# Altium PCB Driver_S_Comm.PcbDoc (part 4 of 5)
Units mm, origin at the board's own origin, x right, y up, seen from the top; angles counter-clockwise.
Board outline 200.2 x 290.2 mm, 2 copper layers (Top Layer, Bottom Layer), stack 1.371 mm thick; 518 components, 197 nets, 1403 pads, 323 vias.
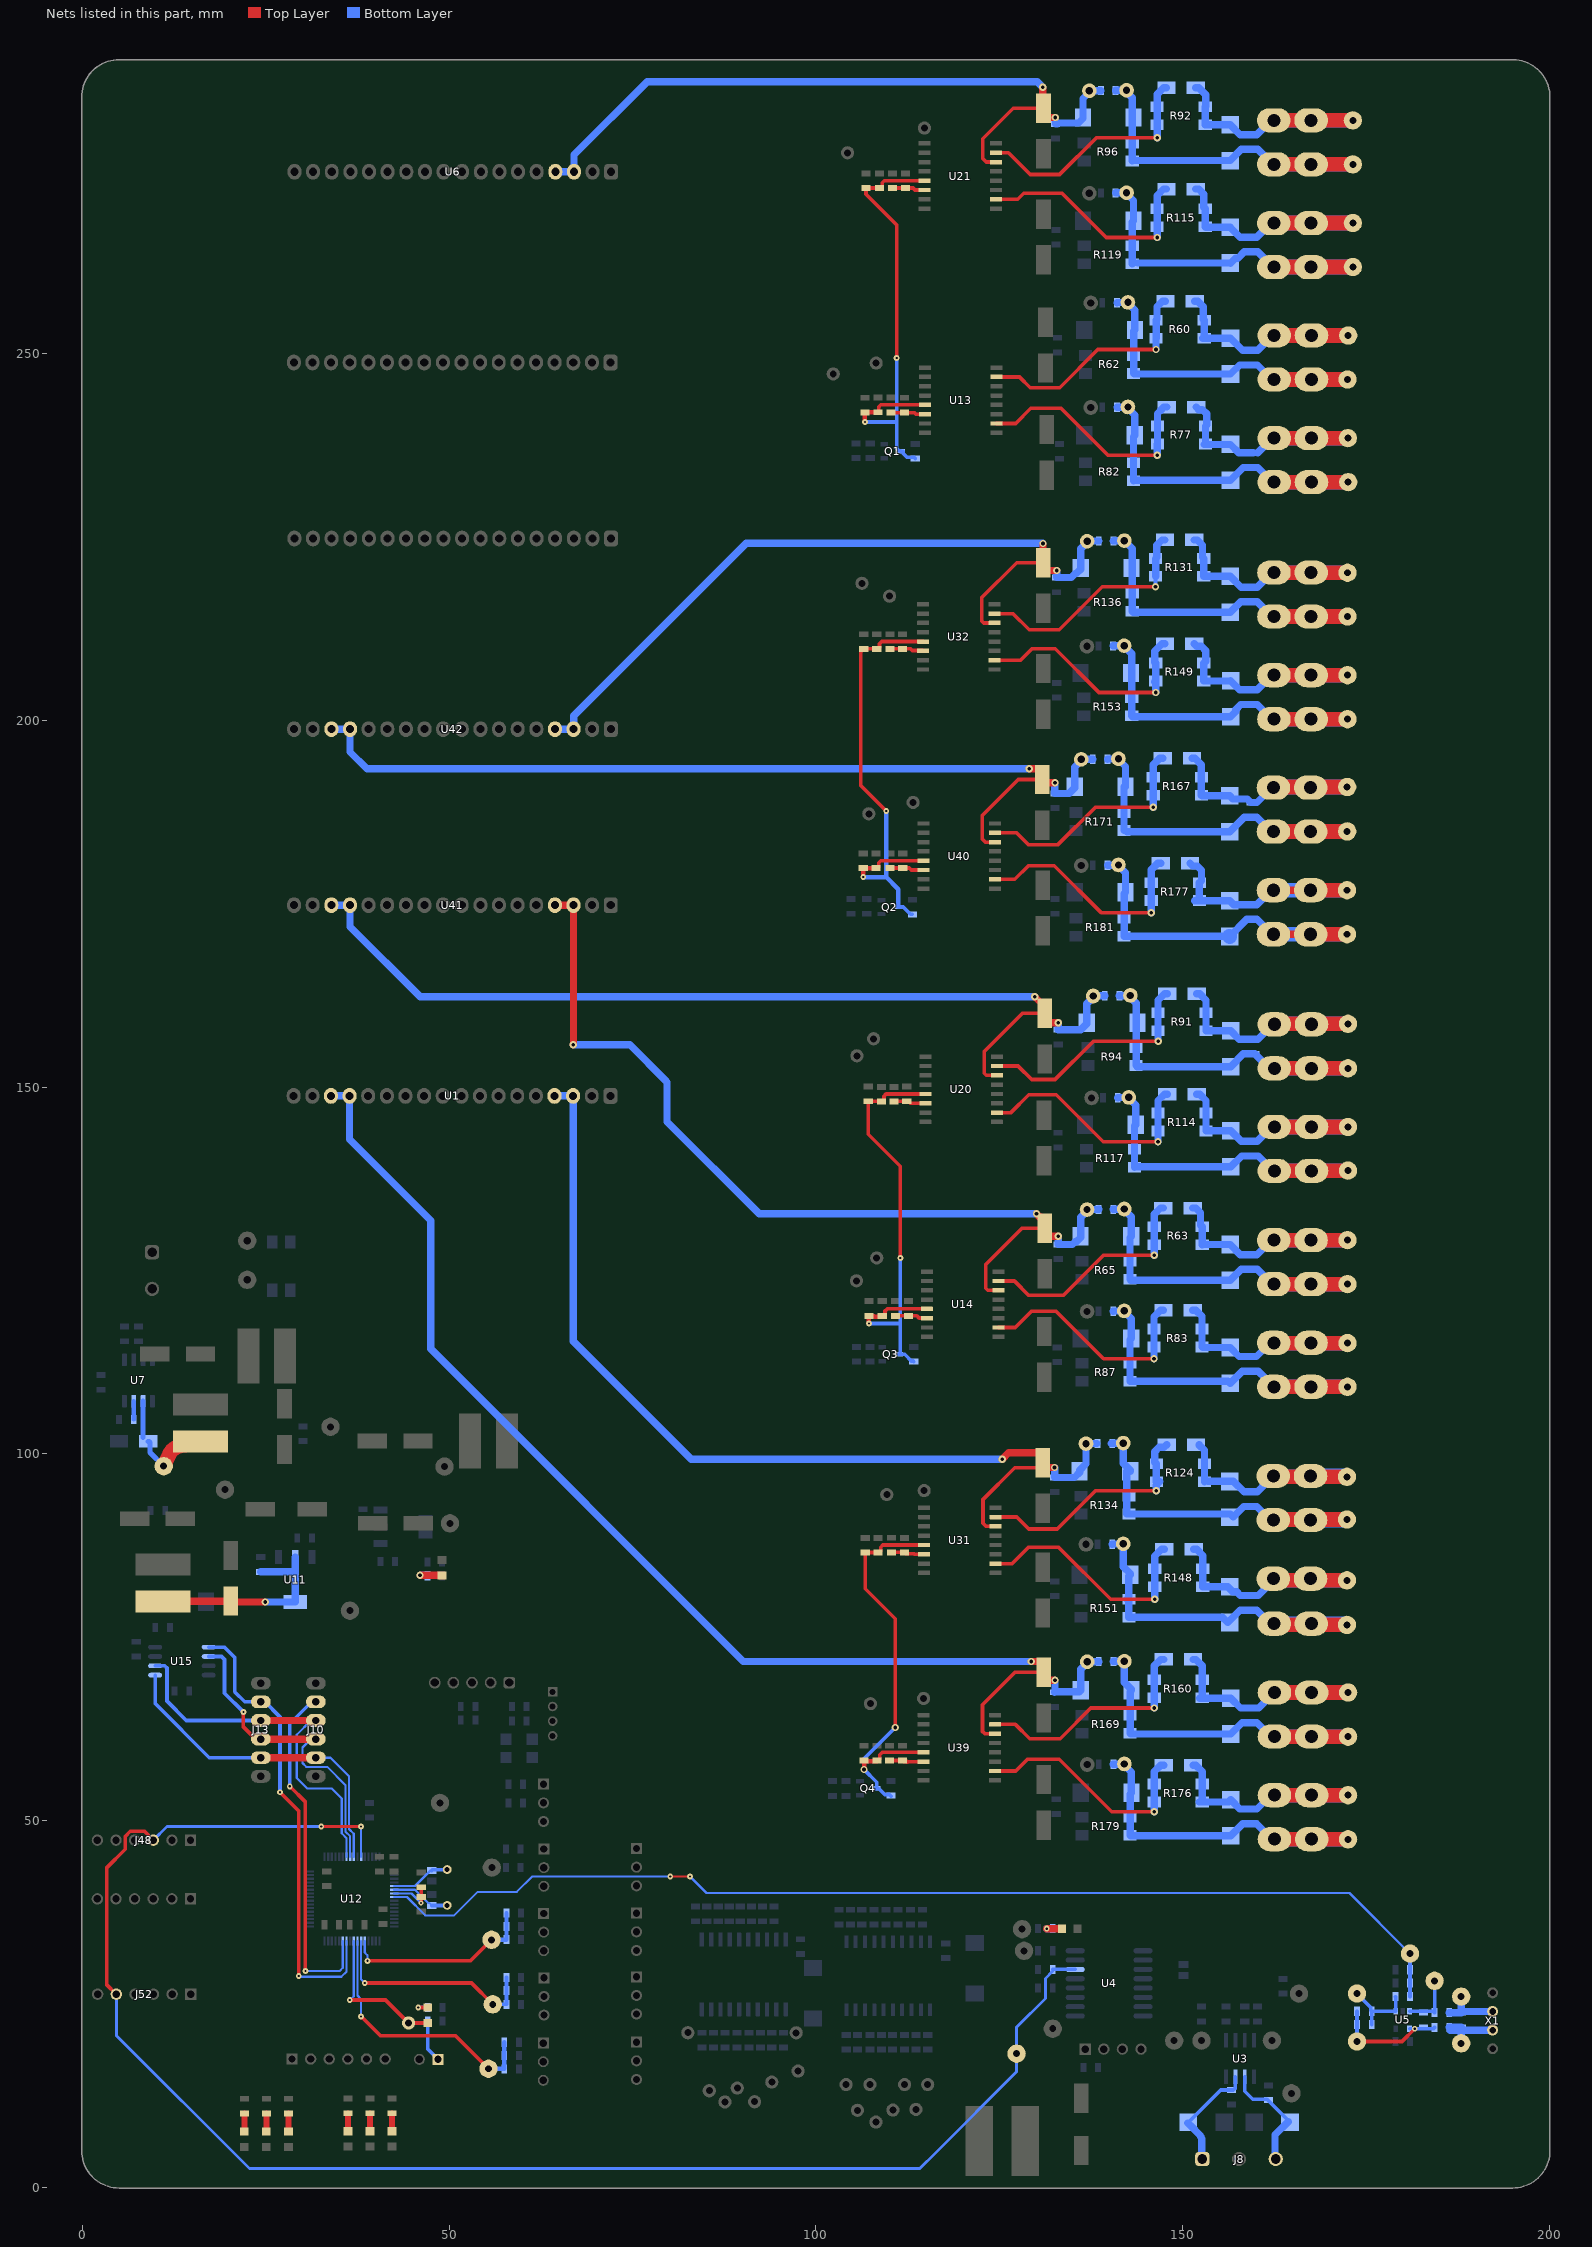
[diagram p3: the nets of this part, all layers, seen from the top]

## Via types
v1: diameter 1, hole 0.5, Top Layer to Bottom Layer, tented both sides, 118 vias
v2: diameter 0.8, hole 0.3, Top Layer to Bottom Layer, 112 vias
v3: diameter 0.8, hole 0.3, Top Layer to Bottom Layer, tented both sides, 64 vias
v4: diameter 2, hole 1, Top Layer to Bottom Layer, tented both sides, 11 vias
v5: diameter 1, hole 0.5, Top Layer to Bottom Layer, 9 vias
v6: diameter 0.8, hole 0.4, Top Layer to Bottom Layer, 5 vias
v7: diameter 0.8, hole 0.4, Top Layer to Bottom Layer, tented both sides, 2 vias
v8: diameter 0.7, hole 0.3, Top Layer to Bottom Layer, tented both sides, 1 vias
v9: diameter 1.5, hole 1, Top Layer to Bottom Layer, tented both sides, 1 vias

## Nets (pads, with @x,y where several pads share a name; then routed paths per layer and width w, separated by ;. In a path a pad name is that pad's centre, name@x,y a point inside that pad or via, vN(x,y) a via of type N, cw(c..) or ccw(c..) an arc to the next point about the centre after c; other vN are vias at no path point) (continued)
GND_-24V_3: C86.1 C88.2 C92.2 C94.1 U6.3 U6.4 U21.14 VD13.2 | length 103.7
  Top Layer w0.5: U21.14@124.565,276.138 123.237,276.138 122.755,276.62 122.755,279.312 126.925,283.483 130.55,283.483 C88.2@131.05,283.483 131.05,282.973 C88.2@131.8,282.223
  Top Layer w1: v1(130.95,286.325) 130.95,283.583 C88.2@131.05,283.483 ; C88.2@131.8,282.223 v1(132.66,282.223)
  Bottom Layer w0.5: v1(132.66,282.223) v1@132.67,282.213 ; C86.1@132.67,281.352 C86.1@132.68,281.343
  Bottom Layer w1: U6.4@64.48,274.815 U6.3@67.02,274.815 67.02,277.12 77,287.1 130.175,287.1 v1(130.95,286.325) ; v1@132.67,282.213 132.67,281.352 C86.1@132.68,281.343 ; C86.1@132.9,281.343 133.03,281.473 135.82,281.473 136.42,282.073 136.42,284.81 137.295,285.685 VD13.2@137.295,285.858 137.307,285.87 138.858,285.87 C94.1@138.87,285.882
GND_-24V_4: C115.1 C117.2 C122.2 C123.1 U32.14 U42.3 U42.4 VD23.2 | length 109.3
  Top Layer w0.5: U32.14@124.375,213.299 122.898,213.299 122.605,213.591 122.605,216.718 127.398,221.512 130.5,221.512 C117.2@131,221.512
  Top Layer w1: v1(130.975,224.125) 130.975,221.537 C117.2@131,221.512 131,220.944 131.5,220.444 v1(132.85,220.444)
  Bottom Layer w1: U42.4@64.43,198.815 U42.3@66.97,198.815 66.99,198.835 66.99,200.644 90.496,224.15 130.95,224.15 v1(130.975,224.125) ; v1(132.85,220.444) 132.85,219.524 C115.1@132.81,219.484 134.82,219.484 135.37,220.034 135.52,220.034 136.116,220.629 C122.2@136.116,220.779 ; C122.2@136.12,220.784 136.12,223.401 136.995,224.276 VD23.2@136.995,224.449 137.007,224.461 138.558,224.461 C123.1@138.57,224.473
GND_-24V_5: C149.1 C150.2 C153.2 C154.1 U40.14 U42.15 U42.16 VD31.2 | length 129.6
  Top Layer w0.5: U40.14@124.428,183.419 123.108,183.419 122.693,183.834 122.693,187.034 127.601,191.942 C150.2@130.873,191.942 ; C150.2@130.19,193.604 130.873,192.921 C150.2@130.873,191.942 ; C150.2@131.311,191.504 C150.2@130.873,191.942
  Top Layer w1: v1(129.1,193.4) C150.2@129.987,193.4 ; C150.2@131.311,191.504 v1(132.603,191.504)
  Bottom Layer w1: U42.16@33.95,198.815 U42.15@36.49,198.815 36.49,195.71 38.8,193.4 v1(129.1,193.4) ; v1(132.603,191.504) 132.593,191.494 C149.1@132.593,190.054 134.543,190.054 134.703,190.214 134.713,190.214 135.313,190.814 135.313,193.651 136.188,194.526 VD31.2@136.188,194.699 136.2,194.711 137.75,194.711 C154.1@137.763,194.724
GND_-24V_6: C59.1 C60.2 C63.2 C66.1 U14.14 U41.3 U41.4 VD5.2 | length 128.2
  Top Layer w0.5: U14.14@124.891,122.309 123.449,122.309 123.156,122.602 123.156,125.819 128.104,130.767 C60.2@131.236,130.767 131.236,131.614 C60.2@130.747,132.103
  Top Layer w1: U41.4@64.42,174.815 U41.3@66.96,174.815 66.96,155.81 v1(66.925,155.775) ; v1(130.093,132.724) 130.55,132.267 130.736,132.267 130.747,132.256 C60.2@130.747,132.103 ; C60.2@131.236,130.767 131.236,130.159 131.736,129.659 v1(133.046,129.659)
  Bottom Layer w1: v1(66.925,155.775) 74.675,155.775 79.55,150.9 79.55,150.844 79.705,150.689 79.705,145.295 92.276,132.724 v1(130.093,132.724) ; v1(133.046,129.659) 133.046,128.569 C59.1@133.056,128.559 135.006,128.559 135.356,128.909 135.506,128.909 136.106,129.509 C63.2@136.106,129.659 136.106,132.266 136.981,133.141 VD5.2@136.981,133.314 136.993,133.326 138.543,133.326 C66.1@138.556,133.339
GND_-24V_7: C85.1 C87.2 C90.2 C93.1 U20.14 U41.15 U41.16 VD12.2 | length 134.5
  Top Layer w0.5: U20.14@124.689,151.614 123.267,151.614 122.974,151.907 122.974,154.869 128.172,160.067 C87.2@131.194,160.067 ; C87.2@130.358,161.817 130.444,161.817 131.194,161.067 C87.2@131.194,160.067 ; C87.2@131.944,158.799 131.194,159.549 C87.2@131.194,160.067
  Top Layer w1: v1(129.85,162.325) C87.2@130.358,161.817 ; C87.2@131.944,158.799 v1(133.074,158.799)
  Bottom Layer w0.5: C85.1@133.064,157.839 C85.1@133.069,157.844 ; v1@133.069,158.794 v1(133.074,158.799)
  Bottom Layer w1: U41.16@33.94,174.815 U41.15@36.48,174.815 36.48,171.895 46.05,162.325 v1(129.85,162.325) ; C85.1@133.064,157.839 136.134,157.839 136.944,158.649 136.944,161.386 137.819,162.261 VD12.2@137.819,162.434 137.831,162.446 139.381,162.446 C93.1@139.394,162.459 ; C85.1@133.069,157.844 v1@133.069,158.794
GND_-24V_8: C113.1 C114.2 C118.2 C121.1 U1.3 U1.4 U31.14 VD22.2 | length 136.2
  Top Layer w0.5: U31.14@124.519,90.12 123.209,90.12 122.794,90.535 122.794,93.775 127.134,98.115 130.276,98.115 C114.2@130.954,98.793
  Top Layer w1: v1(125.4,99.275) 126.275,100.15 130.454,100.15 130.954,99.65 C114.2@130.954,98.793 ; C114.2@130.97,98.809 130.97,98.619 131.454,98.135 v1(132.554,98.135)
  Bottom Layer w1: U1.4@64.37,148.815 U1.3@66.91,148.815 66.91,115.365 83,99.275 v1(125.4,99.275) ; v1(132.554,98.135) 132.591,98.098 132.591,96.81 C113.1@132.574,96.793 135.272,96.793 135.964,97.485 C118.2@135.964,97.635 ; C118.2@135.964,97.785 136.839,98.66 VD22.2@136.839,101.4 ; VD22.2@136.731,101.413 138.281,101.413 C121.1@138.294,101.425
GND_-24V_9: C147.1 C148.2 C151.2 C152.1 U1.15 U1.16 U39.14 VD30.2 | length 173.1
  Top Layer w0.5: U39.14@124.369,61.85 124.354,61.865 123.027,61.865 122.734,62.158 122.734,65.815 127.142,70.223 C148.2@131.074,70.223
  Top Layer w1: v1(129.375,71.7) 130.574,71.7 131.074,71.2 C148.2@131.074,70.223 131.074,69.623 131.574,69.123 v1(132.615,69.123)
  Bottom Layer w1: U1.16@33.89,148.815 U1.15@36.43,148.815 36.43,142.895 47.5,131.825 47.5,114.325 90.125,71.7 v1(129.375,71.7) ; C147.1@132.538,67.509 132.615,67.587 v1(132.615,69.123) ; C147.1@132.538,67.575 135.94,67.575 C151.2@136.124,67.759 136.124,70.621 136.999,71.496 VD30.2@136.999,71.664 137.011,71.676 138.561,71.676 C152.1@138.574,71.689
NetC1_2: C1.2 R1.2 R4.1 TP1.1 U12.23 | length 36.6
  Top Layer w0.5: v3(38.007,23.299) 40.631,20.675 50.863,20.675 TP1.1@55.372,16.167
  Bottom Layer w0.3: U12.23@37.507,33.576 37.507,26.157 38.007,25.657 v3(38.007,23.299)
  Bottom Layer w0.6: TP1.1@55.372,16.167 55.381,16.157 57.501,16.157 R1.2@57.511,16.147 57.522,16.158 C1.2@57.522,17.957 R4.1@57.522,19.787
NetC2_2: C2.2 R2.2 R5.1 TP2.1 U12.22 | length 30.1
  Top Layer w0.5: v3(38.5,27.85) 53.049,27.85 TP2.1@55.948,24.951
  Bottom Layer w0.3: U12.22@38.007,33.576 38.007,28.343 v3(38.5,27.85)
  Bottom Layer w0.5: TP2.1@55.948,24.951 R2.2@57.826,24.951 ; R2.2@57.826,24.951 R5.1@57.826,28.62
NetC3_2: C3.2 R3.2 R6.1 TP3.1 U12.21 | length 26.6
  Top Layer w0.5: v3(38.853,30.882) 52.921,30.882 TP3.1@55.793,33.754
  Bottom Layer w0.3: U12.21@38.507,33.576 38.507,32.007 38.855,31.659 v3(38.853,30.882) v3(38.853,30.882)
  Bottom Layer w0.6: TP3.1@55.793,33.754 55.808,33.769 57.808,33.769 R3.2@57.823,33.784 C3.2@57.823,35.552 R6.1@57.823,37.384
NetC26_1: C26.1 R51.1 TP26.1 X1.2 | length 10
  Bottom Layer w0.5: R51.1@186.368,21.813 186.368,21.585 R51.1@186.513,21.44
  Bottom Layer w1: R51.1@186.363,21.808 186.368,21.813 187.988,21.813 C26.1@187.993,21.818 TP26.1@187.993,19.638 ; R51.1@186.513,21.44 X1.2@192.275,21.44
NetC26_2: C26.2 R49.1 TP22.1 X1.3 | length 8.3
  Top Layer w1: TP22.1@187.993,25.998 TP22.1@188.178,25.998
  Bottom Layer w1: R49.1@186.363,23.818 C26.2@187.993,23.818 ; TP22.1@187.993,25.998 C26.2@187.993,23.818 ; X1.3@192.275,23.98 188.18,23.98 188.018,23.818 C26.2@187.993,23.818
NetC27_1: C27.1 C29.1 R51.2 R53.1 TP25.1 U5.4 | length 16.2
  Top Layer w0.5: TP25.1@173.793,19.891 179.936,19.891 v3(181.663,21.618)
  Bottom Layer w0.5: TP25.1@173.793,19.891 C29.1@173.793,23.998 ; U5.4@180.963,21.618 v3(181.663,21.618) 184.213,21.618 184.363,21.768 R51.2@184.363,21.808
NetC27_2: C27.2 R49.2 TP21.1 U5.3 | length 7.8
  Bottom Layer w0.5: U5.3@180.963,24.018 182.836,24.018 184.213,24.018 184.363,23.868 R49.2@184.363,23.818 ; R49.2@184.373,23.828 TP21.1@184.373,28.158
NetC28_2: C28.2 R50.1 R52.1 TP24.1 U12.8 | length 152
  Top Layer w0.3: v2(80.15,42.375) v2(82.855,42.375)
  Bottom Layer w0.3: U12.8@42.507,39.576 44.263,39.576 46.759,37.08 50.687,37.08 53.889,40.282 59.232,40.282 61.325,42.375 v2(80.15,42.375) ; v2(82.855,42.375) 85.105,40.125 172.766,40.125 TP24.1@181.023,31.868
  Bottom Layer w0.5: R50.1@181.013,25.998 R52.1@181.013,27.838 181.013,29.651 C28.2@181.019,29.657 181.021,29.659 181.021,31.866 TP24.1@181.023,31.868
NetC29_2: C29.2 R50.2 R53.2 TP23.1 U5.1 | length 10.3
  Bottom Layer w0.5: TP23.1@173.793,26.418 175.643,24.568 175.643,24.148 C29.2@175.793,23.998 ; R53.2@175.793,22.188 C29.2@175.793,23.998 ; R50.2@179.013,25.998 179.063,25.948 U5.1@179.063,24.018 175.813,24.018 C29.2@175.793,23.998
NetC36_1: C36.1 U7.3 | length 2.5
  Bottom Layer w0.6: C36.1@7.005,104.691 U7.3@7.005,107.184
NetC48_2: C48.2 R58.1 U12.7 | length 6.3
  Top Layer w0.5: v8(46.177,38.777) 46.186,38.786 46.186,39.719 46.195,39.728 R58.1@46.195,40.881
  Bottom Layer w0.3: U12.7@42.507,40.076 44.878,40.076 v8(46.177,38.777)
NetC50_1: C50.1 C53.2 L7.1 U11.2 | length 29
  Top Layer w1: L7.1@10.96,79.899 20.175,79.899 C50.1@20.21,79.934 20.325,79.819 v1(24.935,79.819)
  Bottom Layer w1: C53.2@24.31,83.919 28.775,83.919 29.02,83.674 ; v1(24.935,79.819) U11.2@29.02,79.819 29.02,83.674 ; U11.2@29.02,85.919 29.02,83.674
NetC55_1: C55.1 U12.5 Y1.2 | length 8.2
  Bottom Layer w0.3: U12.5@42.507,41.076 45.348,41.076 47.475,43.203 C55.1@47.627,43.203
  Bottom Layer w0.5: C55.1@47.627,43.203 47.73,43.306 Y1.2@49.737,43.306
NetC56_1: C56.1 U12.6 Y1.1 | length 8.1
  Bottom Layer w0.3: U12.6@42.507,40.576 45.339,40.576 47.128,38.788 47.298,38.788 C56.1@47.627,38.459 C56.1@47.66,38.426
  Bottom Layer w0.5: C56.1@47.66,38.426 Y1.1@49.737,38.426
NetC61_1: C61.1 C62.2 J16.1 R61.1 R62.1 TP39.1 VD2.1 VD4.1 | length 52.2
  Top Layer w2: J16.1@162.502,246.498 J16.1@167.582,246.498 TP39.1@172.502,246.498
  Bottom Layer w1: C62.2@141.056,256.955 141.081,256.98 142.531,256.98 VD4.1@142.556,257.006 142.556,256.908 143.506,255.958 C61.1@143.506,253.233 143.331,253.058 R62.1@143.331,249.763 R62.1@143.331,247.313 143.407,247.237 VD2.1@156.542,247.237 157.783,248.478 R61.1@159.692,248.478 160.22,248.478 162.2,246.498 J16.1@162.502,246.498
  Bottom Layer w2: J16.1@162.502,246.498 J16.1@167.582,246.498 TP39.1@172.502,246.498
NetC63_1: C63.1 C66.2 J17.1 R64.1 R65.1 TP44.1 VD3.1 VD5.1 | length 52.8
  Top Layer w2: J17.1@162.446,123.149 J17.1@167.526,123.149 TP44.1@172.486,123.149
  Bottom Layer w1: C66.2@140.556,133.339 140.581,133.364 142.031,133.364 VD5.1@142.056,133.389 142.056,133.291 143.006,132.341 C63.1@143.006,129.659 142.831,129.484 R65.1@142.831,126.249 R65.1@142.831,123.799 142.962,123.668 VD3.1@156.496,123.668 157.997,125.169 R64.1@159.296,125.169 160.203,125.169 162.223,123.149 J17.1@162.446,123.149
  Bottom Layer w2: J17.1@162.446,123.149 J17.1@167.526,123.149 TP44.1@172.486,123.149
NetC64_2: C64.2 C97.2 Q1.3 R73.2 R76.2 R108.2 U13.5 U21.5 | length 65.3
  Top Layer w0.5: C64.2@106.683,242.012 106.693,242.012 R73.2@108.148,242.012 ; R73.2@108.473,242.022 108.582,242.13 108.582,242.758 108.857,243.033 U13.5@114.887,243.033 ; v3(111.025,249.403) 111.025,267.55 106.836,271.739 106.836,272.453 106.847,272.464 C97.2@106.847,272.603 R108.2@108.667,272.603 108.892,272.603 109.042,272.753 109.042,273.305 109.335,273.598 U21.5@114.815,273.598
  Top Layer w0.6: v3(106.693,240.7) 106.693,242.012 106.693,242.022 R73.2@108.473,242.022
  Bottom Layer w0.5: v3(106.693,240.7) 111.025,240.7 ; v3(111.025,249.403) 111.025,240.7 ; R76.2@113.561,235.72 113.411,235.87 112.475,235.87 111.9,236.445 111.9,236.67 111.675,236.67 Q1.3@111.625,236.72 111.575,236.77 111.338,236.77 111.025,237.083 111.025,240.7
NetC65_2: C65.2 R72.2 U13.6 | length 4.7
  Top Layer w0.5: R72.2@110.263,242.012 110.307,241.968 113.462,241.968 113.667,241.763 U13.6@114.887,241.763
NetC68_2: C68.2 C95.2 Q3.3 R75.2 R106.2 R132.2 U14.5 U20.5 | length 61.3
  Top Layer w0.5: C68.2@107.238,118.824 107.966,118.824 ; R75.2@109.29,118.824 109.44,118.974 109.44,119.476 109.733,119.769 U14.5@115.141,119.769 ; v3(111.525,126.725) 111.525,139.214 107.144,143.595 C95.2@107.144,148.079 108.904,148.079 R106.2@108.934,148.049 109.138,148.049 109.288,148.199 109.288,148.781 109.581,149.074 U20.5@114.939,149.074
  Top Layer w0.6: v3(107.236,117.775) v3(107.236,117.775) 107.237,118.823 C68.2@107.238,118.824 ; 107.966,118.724 109.19,118.724 R75.2@109.29,118.824
  Bottom Layer w0.5: v3(107.236,117.775) 111.498,117.775 ; Q3.3@111.34,113.575 Q3.3@111.448,113.575 ; v3(111.525,126.725) 111.498,126.698 111.498,117.775 ; R132.2@113.347,112.575 113.247,112.675 113.022,112.675 112.122,113.575 Q3.3@111.448,113.575 ; Q3.3@111.448,113.575 111.498,113.625 111.498,117.775
NetC69_2: C69.2 R74.2 U14.6 | length 4.4
  Top Layer w0.5: R74.2@110.868,118.824 C69.2@112.645,118.824 113.781,118.824 114.084,118.521 115.119,118.521 U14.6@115.141,118.499
NetC80_1: C80.1 C82.2 J21.1 R81.1 R82.1 TP51.1 VD6.1 VD8.1 | length 53
  Top Layer w2: J21.1@162.502,232.498 J21.1@167.582,232.498 TP51.1@172.592,232.498
  Bottom Layer w1: C82.2@141.056,242.697 141.081,242.722 142.531,242.722 VD8.1@142.556,242.748 142.556,242.598 143.492,241.662 C80.1@143.492,238.868 143.317,238.693 R82.1@143.317,235.153 R82.1@143.317,232.703 143.371,232.757 VD6.1@156.542,232.757 158.283,234.498 R81.1@159.672,234.498 160.24,234.498 162.24,232.498 J21.1@162.502,232.498
  Bottom Layer w2: J21.1@162.502,232.498 J21.1@167.582,232.498 TP51.1@172.592,232.498
NetC83_1: C83.1 C84.2 J22.1 R86.1 R87.1 TP52.1 VD7.1 VD9.1 | length 53
  Top Layer w2: J22.1@162.446,109.149 J22.1@167.526,109.149 TP52.1@172.486,109.149
  Bottom Layer w1: C84.2@140.556,119.449 140.581,119.474 142.031,119.474 VD9.1@142.056,119.499 142.056,119.401 143.006,118.451 C83.1@143.006,115.734 142.831,115.559 R87.1@142.831,112.364 R87.1@142.831,109.914 156.2,109.914 VD7.1@156.486,109.628 158.147,111.289 R86.1@159.426,111.289 160.306,111.289 161.37,110.224 161.37,110.212 162.434,109.149 J22.1@162.446,109.149
  Bottom Layer w2: J22.1@162.446,109.149 J22.1@167.526,109.149 TP52.1@172.486,109.149
NetC90_1: C90.1 C93.2 J25.1 R93.1 R94.1 TP62.1 VD10.1 VD12.1 | length 51.9
  Top Layer w2: J25.1@162.514,152.579 J25.1@167.594,152.579 TP62.1@172.554,152.579
  Bottom Layer w1: C93.2@141.394,162.459 141.419,162.484 142.869,162.484 VD12.1@142.894,162.509 142.894,162.238 143.669,161.463 R94.1@143.669,155.404 R94.1@143.669,152.954 143.815,152.808 VD10.1@156.554,152.808 158.295,154.549 R93.1@159.854,154.549 J25.1@161.824,152.579
  Bottom Layer w2: J25.1@161.824,152.579 J25.1@162.514,152.579 J25.1@167.594,152.579 TP62.1@172.554,152.579
NetC92_1: C92.1 C94.2 J26.1 R95.1 R96.1 TP63.1 VD11.1 VD13.1 | length 53.8
  Top Layer w2: J26.1@162.45,275.823 J26.1@167.53,275.823 TP63.1@173.226,275.823
  Bottom Layer w1: C94.2@140.87,285.882 140.895,285.907 142.345,285.907 VD13.1@142.37,285.933 142.37,285.662 143.145,284.887 R96.1@143.145,278.738 R96.1@143.145,276.288 143.199,276.342 VD11.1@156.49,276.342 158.021,277.873 R95.1@159.5,277.873 160.237,277.873 162.287,275.823 J26.1@162.45,275.823
  Bottom Layer w2: J26.1@162.45,275.823 J26.1@167.53,275.823 TP63.1@173.226,275.823
NetC96_2: C96.2 R105.2 U20.6 | length 4.4
  Top Layer w0.5: R105.2@110.654,148.049 110.684,148.079 C96.2@112.404,148.079 112.629,148.079 112.904,147.804 U20.6@114.939,147.804
NetC98_2: C98.2 R107.2 U21.6 | length 4.5
  Top Layer w0.5: R107.2@110.45,272.603 113.254,272.603 113.529,272.328 U21.6@114.815,272.328
NetC109_1: C109.1 C111.2 J30.1 R116.1 R117.1 TP69.1 VD14.1 VD16.1 | length 52.2
  Top Layer w2: J30.1@162.514,138.579 162.564,138.629 TP69.1@172.554,138.629
  Bottom Layer w1: C111.2@141.174,148.559 141.199,148.584 142.649,148.584 VD16.1@142.674,148.609 142.674,148.511 143.624,147.561 C109.1@143.624,144.895 143.449,144.72 R117.1@143.449,141.524 R117.1@143.449,139.074 143.533,139.158 VD14.1@156.584,139.158 158.055,140.629 R116.1@159.564,140.629 160.301,140.629 162.351,138.579 J30.1@162.514,138.579
  Bottom Layer w2: J30.1@162.514,138.579 162.564,138.629 TP69.1@172.554,138.629
NetC110_1: C110.1 C112.2 J31.1 R118.1 R119.1 TP70.1 VD15.1 VD17.1 | length 53.5
  Top Layer w2: J31.1@162.45,261.823 J31.1@167.53,261.823 TP70.1@173.226,261.823
  Bottom Layer w1: C112.2@140.87,271.912 140.895,271.937 142.345,271.937 VD17.1@142.37,271.963 142.37,271.843 143.32,270.893 C110.1@143.32,268.143 143.145,267.968 R119.1@143.145,264.738 R119.1@143.145,262.288 R119.1@143.279,262.422 ; R119.1@143.859,262.382 VD15.1@156.5,262.382 ; VD15.1@156.53,262.352 157.22,263.042 157.556,263.042 158.417,263.903 R118.1@159.59,263.903 160.267,263.903 162.347,261.823 J31.1@162.45,261.823
  Bottom Layer w2: J31.1@162.45,261.823 J31.1@167.53,261.823 TP70.1@173.226,261.823
NetC118_1: C118.1 C121.2 J35.1 R133.1 R134.1 TP79.1 VD20.1 VD22.1 | length 53.2
  Top Layer w2: J35.1@162.374,90.985 162.444,91.055 TP79.1@172.414,91.055
  Bottom Layer w1: C121.2@140.294,101.425 140.319,101.45 141.769,101.45 VD22.1@141.794,101.475 ; VD22.1@141.914,101.475 141.914,98.735 142.864,97.785 C118.1@142.864,97.635 ; C118.1@142.389,97.635 142.389,91.8 156.528,91.8 156.934,91.394 158.365,92.825 160.113,92.825 161.953,90.985 J35.1@162.374,90.985 J35.1@162.444,91.055
  Bottom Layer w2: J35.1@162.444,91.055 J35.1@167.454,91.055 ; J35.1@167.454,90.985 TP79.1@172.344,90.985
NetC122_1: C122.1 C123.2 J36.1 R135.1 R136.1 TP83.1 VD21.1 VD23.1 | length 52.5
  Top Layer w2: J36.1@162.46,214.174 J36.1@167.54,214.174 TP83.1@172.5,214.174
  Bottom Layer w1: C123.2@140.57,224.473 140.595,224.498 142.045,224.498 VD23.1@142.07,224.524 142.07,224.503 143.135,223.438 R136.1@143.135,217.339 R136.1@143.135,214.889 143.261,214.763 VD21.1@156.51,214.763 157.931,216.184 R135.1@159.73,216.184 160.207,216.184 162.217,214.174 J36.1@162.46,214.174
  Bottom Layer w2: J36.1@162.46,214.174 J36.1@167.54,214.174 TP83.1@172.5,214.174
NetC124_2: C124.2 C155.2 Q4.3 R145.2 R154.2 R173.2 U31.5 U39.5 | length 57.7
  Top Layer w0.5: C155.2@106.354,58.035 107.313,58.035 ; R173.2@108.565,58.205 108.715,58.355 108.715,58.968 109.008,59.26 ; R145.2@108.709,86.555 R145.2@108.688,86.555 ; 109.058,59.31 U39.5@114.619,59.31 ; v1(110.825,62.685) 110.825,77.527 106.734,81.618 C124.2@106.734,86.555 R145.2@108.484,86.555 R145.2@108.688,86.555 ; U31.5@114.769,87.58 109.13,87.58 108.838,87.287 108.838,86.705 R145.2@108.688,86.555
  Top Layer w0.6: v1(106.575,56.975) 106.613,57.013 C155.2@106.613,58.035 ; 107.313,58.105 R173.2@108.383,58.105
  Bottom Layer w0.5: Q4.3@108.1,54.4 108.15,54.35 108.6,54.35 109.4,53.55 110.025,53.55 R154.2@110.255,53.32 ; Q4.3@108.325,54.4 108.325,55.225 v1(106.575,56.975) 106.575,58.435 v1(110.825,62.685)
NetC125_2: C125.2 R144.2 U31.6 | length 4.6
  Top Layer w0.5: R144.2@110.314,86.575 112.084,86.575 112.254,86.405 113.314,86.405 113.409,86.31 U31.6@114.769,86.31
NetC126_2: C126.2 C159.2 Q2.3 R104.2 R147.2 R175.2 U32.5 U40.5 | length 61.6
  Top Layer w0.5: C126.2@106.54,209.758 106.315,209.758 106.165,209.608 106.165,209.371 106.11,209.316 106.11,191.14 v3(109.6,187.65) ; C126.2@106.808,209.764 R147.2@108.315,209.764 ; R175.2@108.222,179.879 108.447,179.879 108.597,180.029 108.597,180.586 108.89,180.879 U40.5@114.678,180.879 ; R147.2@108.54,209.764 108.69,209.914 108.69,210.471 108.983,210.764 114.62,210.764 U32.5@114.625,210.759
  Top Layer w0.6: v3(106.463,178.65) C159.2@106.463,179.879 R175.2@108.222,179.879
  Bottom Layer w0.5: Q2.3@111.255,174.563 111.937,174.563 112.837,173.663 112.937,173.563 R104.2@113.162,173.563
  Bottom Layer w0.6: v3(106.463,178.65) 109.6,178.65 ; v3(109.6,187.65) 109.6,178.65 ; Q2.3@111.255,174.563 111.255,176.995 109.6,178.65
NetC127_2: C127.2 R146.2 U32.6 | length 4.7
  Top Layer w0.5: R146.2@110.095,209.764 110.125,209.794 112.923,209.794 113.181,209.536 114.578,209.536 U32.6@114.625,209.489
NetC140_1: C140.1 C141.2 J39.1 R150.1 R151.1 TP87.1 VD24.1 VD26.1 | length 53.6
  Top Layer w1: J39.1@162.484,76.855 J39.1@162.654,76.685
  Top Layer w2: J39.1@162.654,76.685 TP87.1@172.414,76.685
  Bottom Layer w1: C141.2@140.414,87.685 140.439,87.71 141.889,87.71 VD26.1@141.914,87.735 141.914,84.635 142.864,83.685 C140.1@142.864,83.535 142.689,83.36 R151.1@142.689,80.17 ; R151.1@142.484,80.17 142.689,79.965 R151.1@142.689,77.72 155.438,77.72 156.144,77.014 157.825,78.695 160.112,78.695 161.952,76.855 J39.1@162.484,76.855 ; TP87.1@172.244,76.855 TP87.1@172.414,76.685
  Bottom Layer w2: J39.1@162.484,76.855 J39.1@167.564,76.855 TP87.1@172.244,76.855
NetC142_1: C142.1 C143.2 J40.1 R152.1 R153.1 TP88.1 VD25.1 VD27.1 | length 52.7
  Top Layer w2: J40.1@162.46,200.174 J40.1@167.54,200.174 TP88.1@172.5,200.174
  Bottom Layer w1: C143.2@140.54,210.153 140.565,210.178 142.015,210.178 VD27.1@142.04,210.203 142.04,210.152 143.075,209.117 R153.1@143.075,203.098 R153.1@143.075,200.648 143.2,200.523 VD25.1@156.55,200.523 157.25,201.223 157.25,201.484 157.949,202.184 160.207,202.184 162.217,200.174 J40.1@162.46,200.174
  Bottom Layer w2: J40.1@162.46,200.174 J40.1@167.54,200.174 TP88.1@172.5,200.174
NetC151_1: C151.1 C152.2 J44.1 R168.1 R169.1 TP100.1 VD28.1 VD30.1 | length 53.1
  Top Layer w1: J44.1@162.534,61.465 J44.1@162.554,61.445
  Top Layer w2: J44.1@162.554,61.445 TP100.1@172.574,61.445
  Bottom Layer w1: C152.2@140.574,71.689 140.599,71.714 142.049,71.714 VD30.1@142.074,71.739 142.074,68.859 143.024,67.909 C151.1@143.024,67.759 142.849,67.584 R169.1@142.849,64.344 R169.1@142.849,61.894 142.928,61.814 VD28.1@156.574,61.814 158.115,63.355 R168.1@159.524,63.355 160.162,63.355 162.052,61.465 J44.1@162.534,61.465
  Bottom Layer w2: J44.1@162.534,61.465 162.554,61.445 TP100.1@172.574,61.445
NetC153_1: C153.1 C154.2 J45.1 R170.1 R171.1 TP101.1 VD29.1 VD31.1 | length 53.4
  Top Layer w1: J45.1@162.393,184.854 J45.1@162.413,184.874
  Top Layer w2: J45.1@162.413,184.874 TP101.1@172.453,184.874
  Bottom Layer w1: C154.2@139.763,194.724 139.788,194.749 141.238,194.749 VD31.1@141.263,194.774 141.263,194.664 142.213,193.714 C153.1@142.213,190.964 ; R171.1@142.008,184.999 R171.1@142.008,187.449 C153.1@142.008,190.964 ; R171.1@142.449,184.843 VD29.1@156.433,184.843 158.414,186.824 R170.1@159.333,186.824 160.1,186.824 162.07,184.854 J45.1@162.393,184.854
  Bottom Layer w2: J45.1@162.393,184.854 162.413,184.874 TP101.1@172.453,184.874
NetC156_2: C156.2 R172.2 U39.6 | length 4.6
  Top Layer w0.5: R172.2@110.064,58.205 C156.2@111.824,58.205 111.974,58.055 112.427,58.055 112.492,57.99 ; 112.542,58.04 U39.6@114.619,58.04
NetC162_2: C162.2 R174.2 U40.6 | length 4.7
  Top Layer w0.5: R174.2@110.103,179.879 C162.2@111.843,179.879 112.738,179.879 113.008,179.609 U40.6@114.678,179.609
NetC171_1: C171.1 C172.2 J50.1 R178.1 R179.1 TP104.1 VD32.1 VD34.1 | length 53.1
  Top Layer w1: J50.1@162.534,47.465 J50.1@162.544,47.455
  Top Layer w2: J50.1@162.544,47.455 TP104.1@172.574,47.455
  Bottom Layer w1: C172.2@140.574,57.675 140.599,57.7 142.049,57.7 VD34.1@142.074,57.725 142.074,57.59 143.024,56.64 C171.1@143.024,53.805 142.849,53.63 R179.1@142.849,50.47 R179.1@142.849,48.02 142.925,47.944 VD32.1@156.574,47.944 158.215,49.585 R178.1@159.714,49.585 160.076,49.585 J50.1@162.196,47.465
  Bottom Layer w2: J50.1@162.196,47.465 J50.1@162.534,47.465 J50.1@167.614,47.465 167.624,47.455 TP104.1@172.574,47.455
NetC173_1: C173.1 C174.2 J51.1 R180.1 R181.1 TP105.1 VD33.1 VD35.1 | length 54
  Top Layer w1: J51.1@162.393,170.854 J51.1@167.473,170.854
  Top Layer w2: J51.1@167.473,170.854 TP105.1@172.433,170.854
  Bottom Layer w1: C174.2@139.763,180.254 139.788,180.279 141.238,180.279 VD35.1@141.263,180.304 141.263,180.206 142.213,179.256 C173.1@142.213,176.564 142.038,176.389 R181.1@142.038,173.039 R181.1@142.038,170.589 VD33.1@156.397,170.589 ; VD33.1@156.433,170.553 158.764,172.884 R180.1@159.403,172.884 160.16,172.884 162.19,170.854 J51.1@162.393,170.854
  Bottom Layer w2: VD33.1@156.397,170.589 VD33.1@156.433,170.553 ; J51.1@162.393,170.854 J51.1@167.473,170.854 TP105.1@172.433,170.854
NetD1_1: D1.1 R7.1 | length 2.5
  Top Layer w0.8: D1.1@28.081,7.626 R7.1@28.081,10.076
NetD2_1: D2.1 R8.1 | length 2.5
  Top Layer w0.8: D2.1@25.081,7.626 R8.1@25.081,10.076
NetD3_1: D3.1 R9.1 | length 2.5
  Top Layer w0.8: D3.1@22.081,7.626 R9.1@22.081,10.076
NetD4_1: D4.1 R10.1 | length 2.5
  Top Layer w0.8: D4.1@42.231,7.651 R10.1@42.231,10.101
NetD5_1: D5.1 R11.1 | length 2.5
  Top Layer w0.8: D5.1@39.231,7.651 R11.1@39.231,10.101
NetD6_1: D6.1 R12.1 | length 2.5
  Top Layer w0.8: D6.1@36.231,7.651 R12.1@36.231,10.101
NetD8_1: D8.1 R39.1 | length 2.9
  Top Layer w1: v3(131.486,35.267) D8.1@133.593,35.267
  Bottom Layer w1: v3(131.486,35.267) 132.283,35.267 R39.1@132.303,35.287
NetD10_1: D10.1 L5.1 TP28.1 U7.2 | length 15.8
  Top Layer w2: TP28.1@11.09,98.319 11.833,99.919 cw(c13.647,99.077) 13.192,101.025 13.98,101.209 L5.1@16.12,101.709
  Bottom Layer w0.7: D10.1@8.275,102.259 U7.2@8.275,107.184 ; D10.1@8.98,101.709 9.08,101.709 9.23,101.559 9.23,100.179 TP28.1@11.09,98.319
NetD11_1: D11.1 R55.1 | length 4
  Top Layer w1: v1(46.025,83.435) D11.1@49.035,83.435
  Bottom Layer w1: v1(46.025,83.435) R55.1@46.965,83.435
NetD12_1: D12.1 R60.1 U13.15 | length 31.9
  Top Layer w0.5: U13.15@124.637,246.843 127.777,246.843 129.252,245.368 133.247,245.368 138.457,250.578 v1(146.382,250.578)
  Bottom Layer w0.5: R60.1@146.382,252.118 R60.1@146.397,252.133
  Bottom Layer w1: v1(146.382,250.578) R60.1@146.382,252.118 ; R60.1@146.397,252.133 R60.1@146.397,254.583 146.514,254.7 146.514,256.39 147.272,257.148 D12.1@147.672,257.148
NetD12_2: D12.2 J14.1 R60.2 R61.2 TP35.1 VD2.2 | length 37.3
  Top Layer w2: J14.1@162.502,252.498 J14.1@167.582,252.498 TP35.1@172.592,252.498
  Bottom Layer w1: D12.2@151.672,257.148 152.072,257.148 152.83,256.39 152.83,254.7 R60.2@152.947,254.583 R60.2@152.947,252.133 R60.2@152.962,252.118 ; R60.2@152.722,252.118 VD2.2@156.542,252.118 158.182,250.478 R61.2@159.692,250.478 160.26,250.478 162.28,252.498 J14.1@162.502,252.498
  Bottom Layer w2: J14.1@162.502,252.498 J14.1@167.582,252.498 TP35.1@172.592,252.498
NetD13_1: D13.1 R63.1 U14.15 | length 31.5
  Top Layer w0.5: U14.15@124.891,123.579 127.076,123.579 129.006,121.649 133.786,121.649 139.211,127.074 v1(146.136,127.074)
  Bottom Layer w1: v1(146.136,127.074) R63.1@146.136,128.5 146.136,132.67 146.991,133.525 D13.1@147.391,133.525
NetD13_2: D13.2 J15.1 R63.2 R64.2 TP36.1 VD3.2 | length 37.1
  Top Layer w2: J15.1@162.446,129.149 J15.1@167.526,129.149 TP36.1@172.486,129.149
  Bottom Layer w1: D13.2@151.391,133.525 151.791,133.525 152.453,132.864 152.453,131.175 152.678,130.95 R63.2@152.686,130.95 R63.2@152.686,128.5 152.734,128.549 VD3.2@156.496,128.549 157.876,127.169 R64.2@159.296,127.169 160.163,127.169 162.143,129.149 J15.1@162.446,129.149
  Bottom Layer w2: J15.1@162.446,129.149 J15.1@167.526,129.149 TP36.1@172.486,129.149
NetD14_1: D14.1 R77.1 U13.10 | length 32.5
  Top Layer w0.5: U13.10@124.637,240.493 127.257,240.493 129.322,242.558 133.422,242.558 139.822,236.158 v1@146.332,236.158
  Bottom Layer w0.5: R77.1@146.572,237.694 R77.1@146.581,237.703
  Bottom Layer w1: v1(146.572,236.158) R77.1@146.572,237.694 ; R77.1@146.581,237.703 R77.1@146.581,240.153 146.581,241.863 147.106,242.388 147.456,242.738 D14.1@147.856,242.738
NetD14_2: D14.2 J19.1 R77.2 R81.2 TP45.1 VD6.2 | length 36.5
  Top Layer w2: J19.1@162.502,238.498 J19.1@167.582,238.498 TP45.1@172.542,238.498
  Bottom Layer w1: D14.2@151.856,242.738 152.206,242.388 152.726,242.388 153.312,241.802 153.312,240.334 R77.2@153.131,240.153 R77.2@153.131,237.703 R77.2@153.196,237.638 ; R77.2@152.956,237.638 VD6.2@156.542,237.638 157.682,236.498 R81.2@159.672,236.498 ; R81.2@160.24,236.498 162.24,238.498 J19.1@162.502,238.498
  Bottom Layer w2: J19.1@162.502,238.498 J19.1@167.582,238.498 TP45.1@172.542,238.498
NetD15_1: D15.1 R83.1 U14.10 | length 32.2
  Top Layer w0.5: U14.10@124.891,117.229 127.186,117.229 129.406,119.449 132.756,119.449 139.236,112.969 v1(146.101,112.969)
  Bottom Layer w1: v1(146.101,112.969) R83.1@146.101,114.574 R83.1@146.101,117.024 146.101,118.704 147.006,119.609 D15.1@147.406,119.609
NetD15_2: D15.2 J20.1 R83.2 R86.2 TP49.1 VD7.2 | length 37
  Top Layer w1: J20.1@162.446,115.149 J20.1@162.486,115.109
  Top Layer w2: J20.1@162.486,115.109 TP49.1@172.486,115.109
  Bottom Layer w1: D15.2@151.406,119.609 151.806,119.609 152.651,118.764 R83.2@152.651,114.574 152.716,114.509 VD7.2@156.486,114.509 157.706,113.289 R86.2@159.426,113.289 160.074,113.289 161.934,115.149 J20.1@162.446,115.149
  Bottom Layer w2: J20.1@162.446,115.149 162.486,115.109 TP49.1@172.486,115.109
NetD16_1: D16.1 R91.1 U20.15 | length 32.2
  Top Layer w0.5: U20.15@124.689,152.884 127.579,152.884 129.424,151.039 132.624,151.039 137.864,156.279 v1(146.684,156.279)
  Bottom Layer w0.5: R91.1@146.659,157.694 R91.1@146.663,157.69 ; v1@146.663,156.3 v1(146.684,156.279)
  Bottom Layer w1: R91.1@146.659,157.694 R91.1@146.659,160.144 146.659,161.854 147.534,162.729 D16.1@147.934,162.729 ; v1@146.663,156.3 R91.1@146.663,157.69
NetD16_2: D16.2 J23.1 R91.2 R93.2 TP56.1 VD10.2 | length 36.5
  Top Layer w1: J23.1@162.514,158.579 J23.1@162.574,158.639
  Top Layer w2: J23.1@162.574,158.639 TP56.1@172.554,158.639
  Bottom Layer w1: D16.2@151.934,162.729 152.334,162.729 153.209,161.854 R91.2@153.209,160.144 R91.2@153.209,157.694 156.549,157.694 VD10.2@156.554,157.689 157.694,156.549 R93.2@159.854,156.549 160.281,156.549 162.311,158.579 J23.1@162.514,158.579
  Bottom Layer w2: J23.1@162.514,158.579 162.574,158.639 TP56.1@172.554,158.639
NetD17_1: D17.1 R92.1 U21.15 | length 32.8
  Top Layer w0.5: U21.15@124.565,277.408 126.255,277.408 129.22,274.443 133.24,274.443 138.26,279.463 v1(146.535,279.463)
  Bottom Layer w1: v1(146.535,279.463) R92.1@146.535,281.218 R92.1@146.535,283.668 146.535,285.398 147.41,286.273 D17.1@147.81,286.273
NetD17_2: D17.2 J24.1 R92.2 R95.2 TP55.1 VD11.2 | length 38.2
  Top Layer w2: J24.1@162.45,281.823 J24.1@167.53,281.823 TP55.1@173.226,281.823
  Bottom Layer w1: D17.2@151.81,286.273 152.21,286.273 153.176,285.307 153.176,283.758 R92.2@153.085,283.668 R92.2@153.085,281.218 153.09,281.223 VD11.2@156.49,281.223 157.84,279.873 R95.2@159.5,279.873 160.137,279.873 162.087,281.823 J24.1@162.45,281.823
  Bottom Layer w2: J24.1@162.45,281.823 J24.1@167.53,281.823 TP55.1@173.226,281.823
NetD18_1: D18.1 R114.1 U20.10 | length 32.9
  Top Layer w0.5: U20.10@124.689,146.534 126.609,146.534 129.034,148.959 132.784,148.959 139.179,142.564 v1(146.659,142.564)
  Bottom Layer w1: v1(146.659,142.564) R114.1@146.659,144.024 R114.1@146.659,146.474 146.659,148.184 147.534,149.059 D18.1@147.934,149.059
NetD18_2: D18.2 J28.1 R114.2 R116.2 TP67.1 VD14.2 | length 36.6
  Top Layer w2: J28.1@162.514,144.579 J28.1@167.594,144.579 TP67.1@172.554,144.579
  Bottom Layer w1: D18.2@151.934,149.059 152.334,149.059 153.209,148.184 R114.2@153.209,144.024 153.224,144.039 VD14.2@156.584,144.039 157.994,142.629 R116.2@159.564,142.629 160.201,142.629 162.151,144.579 J28.1@162.514,144.579
  Bottom Layer w2: J28.1@162.514,144.579 J28.1@167.594,144.579 TP67.1@172.554,144.579
NetD19_1: D19.1 R115.1 U21.10 | length 32.2
  Top Layer w0.5: U21.10@124.565,271.058 127.515,271.058 128.345,271.888 133.563,271.888 139.608,265.843 v1(146.535,265.843)
  Bottom Layer w1: v1(146.535,265.843) R115.1@146.535,267.338 R115.1@146.535,269.788 146.535,271.588 147.41,272.463 D19.1@147.81,272.463
NetD19_2: D19.2 J29.1 R115.2 R118.2 TP68.1 VD15.2 | length 38.2
  Top Layer w2: J29.1@162.45,267.823 J29.1@167.53,267.823 TP68.1@173.226,267.823
  Bottom Layer w1: D19.2@151.81,272.463 152.21,272.463 152.912,271.761 152.912,269.961 R115.2@153.085,269.788 R115.2@153.085,267.338 153.16,267.263 VD15.2@156.5,267.263 ; VD15.2@156.52,267.223 157.84,265.903 R118.2@159.59,265.903 160.107,265.903 162.027,267.823 J29.1@162.45,267.823
  Bottom Layer w2: J29.1@162.45,267.823 J29.1@167.53,267.823 TP68.1@173.226,267.823
NetD20_1: D20.1 R124.1 U31.15 | length 32.5
  Top Layer w0.5: U31.15@124.519,91.39 127.399,91.39 129.024,89.765 132.924,89.765 138.134,94.975 v1(146.434,94.975)
  Bottom Layer w1: v1(146.434,94.975) 146.434,95.763 R124.1@146.914,96.243 ; R124.1@146.434,96.203 R124.1@146.434,98.653 146.42,98.653 146.195,98.878 146.195,100.313 146.78,100.898 147.479,100.898 D20.1@147.829,101.248
NetD20_2: D20.2 J32.1 R124.2 R133.2 TP77.1 VD20.2 | length 35.9
  Top Layer w2: J32.1@162.374,96.985 162.484,96.875 TP77.1@172.414,96.875
  Bottom Layer w1: D20.2@152.279,101.288 152.279,101.198 152.984,100.493 R124.2@152.984,96.203 ; R124.2@153.466,96.275 156.934,96.275 158.384,94.825 160.214,94.825 161.298,95.91 161.298,95.922 162.362,96.985 J32.1@162.374,96.985 J32.1@162.484,96.875
  Bottom Layer w2: J32.1@162.484,96.875 J32.1@167.454,96.875 ; J32.1@167.454,96.985 172.168,96.985 172.183,96.971 172.289,96.971 TP77.1@172.304,96.985
NetD21_1: D21.1 R131.1 U32.15 | length 32.4
  Top Layer w0.5: U32.15@124.375,214.569 126.895,214.569 129.1,212.364 133.18,212.364 139.05,218.234 v1(146.32,218.234)
  Bottom Layer w0.5: v1(146.32,218.234) 146.32,219.634 R131.1@146.33,219.644
  Bottom Layer w1: R131.1@146.33,219.644 R131.1@146.33,222.094 146.487,222.251 146.487,223.901 147.205,224.619 D21.1@147.605,224.619
NetD21_2: D21.2 J34.1 R131.2 R135.2 TP78.1 VD21.2 | length 36.9
  Top Layer w2: J34.1@162.46,220.174 162.49,220.144 TP78.1@172.5,220.144
  Bottom Layer w1: D21.2@151.605,224.619 152.005,224.619 152.723,223.901 152.723,222.251 R131.2@152.88,222.094 R131.2@152.88,219.644 VD21.2@156.51,219.644 157.97,218.184 R135.2@159.73,218.184 160.187,218.184 162.177,220.174 J34.1@162.46,220.174
  Bottom Layer w2: J34.1@162.46,220.174 162.49,220.144 TP78.1@172.5,220.144
NetD22_1: D22.1 R142.1 | length 2.6
  Top Layer w0.5: v3(45.797,24.536) 45.818,24.515 47.08,24.515 D22.1@47.087,24.508
  Bottom Layer w0.4: R142.1@47.076,24.524 R142.1@47.087,24.536
  Bottom Layer w0.5: v3(45.797,24.536) 47.064,24.536 R142.1@47.076,24.524
NetD22_2: D22.2 P9.1 R137.2 TP84.1 U12.24 | length 28.7
  Top Layer w0.5: v3(36.45,25.55) 41.333,25.55 TP84.1@44.475,22.408 D22.2@47.087,22.408
  Bottom Layer w0.3: v3(36.45,25.55) 36.475,25.55 36.989,26.064 36.989,33.021 37.005,33.036 37.005,33.574 U12.24@37.007,33.576
  Bottom Layer w0.5: TP84.1@44.475,22.408 46.937,22.408 R137.2@47.087,22.558 ; R137.2@47.087,22.696 R137.2@47.087,22.558 ; P9.1@48.487,17.456 47.087,18.856 R137.2@47.087,22.558
NetD23_1: D23.1 R148.1 U31.10 | length 33.2
  Top Layer w0.5: U31.10@124.519,85.04 126.759,85.04 129.004,87.285 133.094,87.285 140.209,80.17 v1(146.219,80.17)
  Bottom Layer w1: v1(146.219,80.17) R148.1@146.219,81.89 R148.1@146.219,84.34 146.219,86.08 147.124,86.985 D23.1@147.524,86.985
NetD23_2: D23.2 J37.1 R148.2 R150.2 TP85.1 VD24.2 | length 37
  Top Layer w2: J37.1@162.374,82.985 162.594,82.765 TP85.1@172.414,82.765
  Bottom Layer w1: D23.2@151.524,86.985 151.924,86.985 152.769,86.14 R148.2@152.769,84.34 R148.2@152.769,81.89 156.139,81.89 156.144,81.895 156.844,81.195 157.374,81.195 157.874,80.695 160.324,80.695 161.408,81.78 161.408,81.792 J37.1@162.472,82.855
  Bottom Layer w2: J37.1@162.574,82.765 J37.1@167.454,82.765 ; J37.1@167.454,82.985 167.674,82.765 TP85.1@172.414,82.765
NetD24_1: D24.1 R149.1 U32.10 | length 32.7
  Top Layer w0.5: U32.10@124.375,208.219 127.905,208.219 129.47,209.784 132.66,209.784 138.621,203.823 v1(146.335,203.823)
  Bottom Layer w0.5: R149.1@146.225,205.278 R149.1@146.335,205.389
  Bottom Layer w1: R149.1@146.225,205.278 146.335,205.167 v1(146.335,203.823) ; R149.1@146.335,205.389 R149.1@146.335,207.839 146.225,207.949 146.225,209.478 147.21,210.464 D24.1@147.61,210.464
NetD24_2: D24.2 J38.1 R149.2 R152.2 TP86.1 VD25.2 | length 37.2
  Top Layer w2: J38.1@162.46,206.174 J38.1@167.54,206.174 TP86.1@172.5,206.174
  Bottom Layer w1: D24.2@151.61,210.464 151.96,210.114 152.584,210.114 153.17,209.528 153.17,208.064 152.945,207.839 R149.2@152.885,207.839 R149.2@152.885,205.389 156.535,205.389 VD25.2@156.55,205.404 157.77,204.184 R152.2@159.55,204.184 160.187,204.184 162.177,206.174 J38.1@162.46,206.174
  Bottom Layer w2: J38.1@162.46,206.174 J38.1@167.54,206.174 TP86.1@172.5,206.174
NetD25_1: D25.1 R160.1 U39.15 | length 31.7
  Top Layer w0.5: U39.15@124.369,63.12 U39.15@124.449,63.12 127.213,63.12 129.164,61.169 133.312,61.169 137.502,65.359 v1(146.149,65.359)
  Bottom Layer w1: v1(146.149,65.359) R160.1@146.149,66.74 R160.1@146.149,69.19 146.149,71.1 147.024,71.975 D25.1@147.424,71.975
NetD25_2: D25.2 J42.1 R160.2 R168.2 TP98.1 VD28.2 | length 37.8
  Top Layer w2: J42.1@162.534,67.465 J42.1@167.614,67.465 TP98.1@172.574,67.465
  Bottom Layer w1: D25.2@151.424,71.975 151.824,71.975 152.699,71.1 R160.2@152.699,66.74 R160.2@152.744,66.695 ; R160.2@152.314,66.695 VD28.2@156.574,66.695 157.914,65.355 R168.2@159.524,65.355 160.381,65.355 162.491,67.465 J42.1@162.534,67.465
  Bottom Layer w2: J42.1@162.534,67.465 J42.1@167.614,67.465 TP98.1@172.574,67.465
NetD26_1: D26.1 R167.1 U40.15 | length 31.8
  Top Layer w0.5: U40.15@124.428,184.689 127.358,184.689 128.973,183.074 133.019,183.074 138.119,188.174 v1(146.018,188.174)
  Bottom Layer w1: v1(146.018,188.174) R167.1@146.018,189.799 146.018,190.964 R167.1@146.018,192.249 146.018,193.979 146.893,194.854 D26.1@147.293,194.854
NetD26_2: D26.2 J43.1 R167.2 R170.2 TP99.1 VD29.2 | length 37.1
  Top Layer w1: J43.1@162.393,190.854 J43.1@162.473,190.934
  Top Layer w2: J43.1@162.473,190.934 TP99.1@172.453,190.934
  Bottom Layer w1: D26.2@151.293,194.854 151.693,194.854 152.568,193.979 R167.2@152.568,189.799 152.643,189.724 VD29.2@156.433,189.724 156.865,189.292 158.84,189.292 159.308,188.824 R170.2@159.333,188.824 160.16,188.824 162.19,190.854 J43.1@162.393,190.854
  Bottom Layer w2: J43.1@162.393,190.854 162.473,190.934 TP99.1@172.453,190.934
NetD27_1: D27.1 R176.1 U39.10 | length 32.5
  Top Layer w0.5: U39.10@124.369,56.77 U39.10@124.449,56.77 127.264,56.77 128.851,58.357 133.174,58.357 140.336,51.195 v1(146.149,51.195)
  Bottom Layer w1: v1(146.149,51.195) R176.1@146.149,52.54 R176.1@146.149,54.99 146.149,56.69 147.024,57.565 D27.1@147.424,57.565
NetD27_2: D27.2 J46.1 R176.2 R178.2 TP102.1 VD32.2 | length 37.5
  Top Layer w2: J46.1@162.534,53.465 J46.1@167.614,53.465 TP102.1@172.574,53.465
  Bottom Layer w1: D27.2@151.424,57.565 151.824,57.565 152.699,56.69 R176.2@152.699,52.54 ; R176.2@152.269,52.54 156.289,52.54 VD32.2@156.574,52.825 157.814,51.585 R178.2@159.714,51.585 160.162,51.585 162.042,53.465 J46.1@162.534,53.465
  Bottom Layer w2: J46.1@162.534,53.465 J46.1@167.614,53.465 TP102.1@172.574,53.465
NetD28_1: D28.1 R177.1 U40.10 | length 32.3
  Top Layer w0.5: U40.10@124.428,178.339 127.138,178.339 129.003,180.204 132.523,180.204 138.963,173.764 v1(145.748,173.764)
  Bottom Layer w1: v1(145.748,173.764) R177.1@145.748,175.449 R177.1@145.748,177.899 145.748,179.639 146.623,180.514 D28.1@147.023,180.514
NetD28_2: D28.2 J47.1 R177.2 R180.2 TP103.1 VD33.2 | length 38.1
  Top Layer w1: J47.1@162.393,176.854 J47.1@167.473,176.854
  Top Layer w2: J47.1@167.473,176.854 TP103.1@172.433,176.854
  Bottom Layer w1: D28.2@151.023,180.514 151.373,180.164 151.997,180.164 152.583,179.578 152.583,178.124 152.358,177.899 R177.2@152.298,177.899 R177.2@152.298,175.449 R177.2@152.313,175.434 ; R177.2@151.633,175.434 VD33.2@156.433,175.434 156.983,174.884 R180.2@159.403,174.884 160.1,174.884 162.07,176.854 J47.1@162.393,176.854
  Bottom Layer w2: J47.1@162.393,176.854 J47.1@167.473,176.854 TP103.1@172.433,176.854
NetJ8_1: J8.1 R41.2 U3.7 ZD2.1 | length 15.6
  Bottom Layer w0.5: ZD2.1@150.806,8.862 155.203,13.26 156.92,13.26 157.207,13.547 U3.7@157.207,15.097
  Bottom Layer w1: ZD2.1@150.717,8.773 151.241,8.249 152.32,7.17 cw(c151.612,6.464) 152.612,6.464 152.612,3.952 J8.1@152.702,3.862
NetJ8_3: J8.3 R24.1 U3.6 ZD1.1 | length 15.8
  Bottom Layer w0.5: U3.6@158.477,15.097 158.492,15.082 158.492,13.108 159.588,12.012 161.503,12.012 ZD1.1@164.653,8.862
  Bottom Layer w1: J8.3@162.702,3.862 162.612,3.952 162.612,7.169 ZD1.1@164.393,8.949
NetJ10_2: J10.2 J13.2 U12.57 U15.5 | length 45.7
  Top Layer w1: J13.2@24.328,58.577 J10.2@31.828,58.577
  Bottom Layer w0.3: J10.2@31.828,58.577 33.837,58.577 36.355,56.059 36.355,48.859 37.007,48.207 U12.57@37.007,45.076
  Bottom Layer w0.5: U15.5@9.918,69.837 9.918,65.957 17.298,58.577 J13.2@24.328,58.577
NetJ10_3: J10.3 J13.3 U12.56 U15.2 | length 45.2
  Top Layer w0.3: J10.3@31.828,61.117 J10.3@32.333,61.117
  Top Layer w0.5: v2(21.95,64.8) 21.95,62.762 23.595,61.117 J13.3@24.328,61.117
  Top Layer w1: J13.3@24.328,61.117 J10.3@31.828,61.117
  Bottom Layer w0.3: J10.3@31.828,61.117 31.142,61.117 30,59.975 30,57.85 30.525,57.325 33.375,57.325 35.875,54.825 35.875,48.492 36.507,47.859 U12.56@36.507,45.076
  Bottom Layer w0.5: U15.2@17.218,72.377 18.973,72.377 19.378,71.972 19.378,67.372 v2(21.95,64.8)
NetJ10_4: J10.4 J13.4 U12.55 U15.6 | length 52.4
  Top Layer w1: J13.4@24.328,63.657 J10.4@31.828,63.657
  Bottom Layer w0.3: J10.4@31.828,63.657 31.182,63.657 29.225,61.7 29.225,55.824 30.674,54.375 33.988,54.375 35.355,53.008 35.355,48.262 36.007,47.609 U12.55@36.007,45.076
  Bottom Layer w0.5: U15.6@9.918,71.107 11.232,71.107 11.525,70.814 11.525,66.3 14.168,63.657 J13.4@24.328,63.657
NetJ10_5: J10.5 U12.27 | length 48.3
  Top Layer w0.5: v3(28.272,54.675) 30.407,52.541 v3(30.407,29.482)
  Bottom Layer w0.3: v3(30.407,29.482) 35.05,29.482 35.507,29.939 U12.27@35.507,33.576
  Bottom Layer w0.5: v3(28.272,54.675) 28.272,63.197 31.272,66.197 J10.5@31.828,66.197
NetJ13_5: J13.5 U12.26 U15.1 | length 63.8
  Top Layer w0.5: v3(26.95,53.875) 26.95,53.856 27.806,53 27.812,53 29.498,51.314 29.498,28.802 v3(29.5,28.8)
  Bottom Layer w0.3: J13.5@24.328,66.197 J13.5@24.892,66.197 ; v3(29.5,28.8) 29.593,28.707 35.312,28.707 36.007,29.402 U12.26@36.007,33.576
  Bottom Layer w0.5: U15.1@17.218,73.647 19.378,73.647 20.772,72.253 20.772,67.553 22.128,66.197 J13.5@24.328,66.197 ; J13.5@24.892,66.197 26.95,64.139 v3(26.95,53.875)
NetJ48_3: J48.3 J52.5 R25.1 TP14.1 U4.6 U12.59 | length 221.4
  Top Layer w0.4: v3(32.56,49.197) 32.575,49.182 v3(38.001,49.182)
  Top Layer w0.5: J52.5@4.622,26.332 3.3,27.654 3.3,43.551 5.85,46.101 5.85,47.85 6.537,48.537 8.462,48.537 J48.3@9.667,47.332
  Bottom Layer w0.3: v3(38.001,49.182) 38.007,49.176 U12.59@38.007,45.076
  Bottom Layer w0.4: J52.5@4.622,26.332 4.622,20.703 22.775,2.55 114.175,2.55 116.3,4.675 127.375,15.75 127.375,21.837 131.303,25.765 131.303,28.487 132.303,29.487 R25.1@132.303,29.712 ; J48.3@9.667,47.332 11.532,49.197 v3(32.56,49.197)
  Bottom Layer w0.5: R25.1@132.303,29.712 U4.6@135.368,29.712

## Text inside footprints (layer, text, board x,y; h text height)
U42: Top Overlay "-18V_1" at 63.919,196.875 h1.3 r270; Top Overlay "-18V_1" at 66.459,196.875 h1.3 r270; Top Overlay "+18V_1" at 68.999,196.875 h1.3 r270; Top Overlay "+18V_1" at 71.539,196.875 h1.3 r270; Top Overlay "+18V_2" at 28.36,197.154 h1.3 r270; Top Overlay "+18V_2" at 30.9,197.154 h1.3 r270; Top Overlay "-18V_2" at 33.44,197.154 h1.3 r270; Top Overlay "-18V_2" at 35.98,197.154 h1.3 r270; Top Overlay "+12V" at 53.326,196.058 h1.3 r270; Top Overlay "GND" at 45.707,195.418 h1.3 r270; Top Overlay "GND" at 48.247,195.418 h1.3 r270; Top Overlay "+12V" at 50.786,196.058 h1.3 r270; Bottom Overlay "+18V_2" at 28.36,190.388 h1.3 r270; Bottom Overlay "+18V_2" at 30.9,190.388 h1.3 r270; Bottom Overlay "-18V_2" at 33.44,190.388 h1.3 r270; Bottom Overlay "-18V_2" at 35.98,190.389 h1.3 r270; Bottom Overlay "GND" at 45.707,192.124 h1.3 r270; Bottom Overlay "GND" at 48.247,192.124 h1.3 r270; Bottom Overlay "+12V" at 50.786,191.484 h1.3 r270; Bottom Overlay "+12V" at 53.326,191.484 h1.3 r270; Bottom Overlay "-18V_1" at 63.919,190.667 h1.3 r270; Bottom Overlay "-18V_1" at 66.459,190.667 h1.3 r270; Bottom Overlay "+18V_1" at 68.999,190.667 h1.3 r270; Bottom Overlay "+18V_1" at 71.539,190.667 h1.3 r270